# Altium PCB PCB1.PcbDoc
Units mil, origin at the board's own origin, x right, y up, seen from the top; angles counter-clockwise.
Board outline 6000 x 4000 mil, 2 copper layers (Top Layer, Bottom Layer); 13 components, 9 nets, 34 pads, 0 vias.
Unrouted connection lines stored in the file: 6.
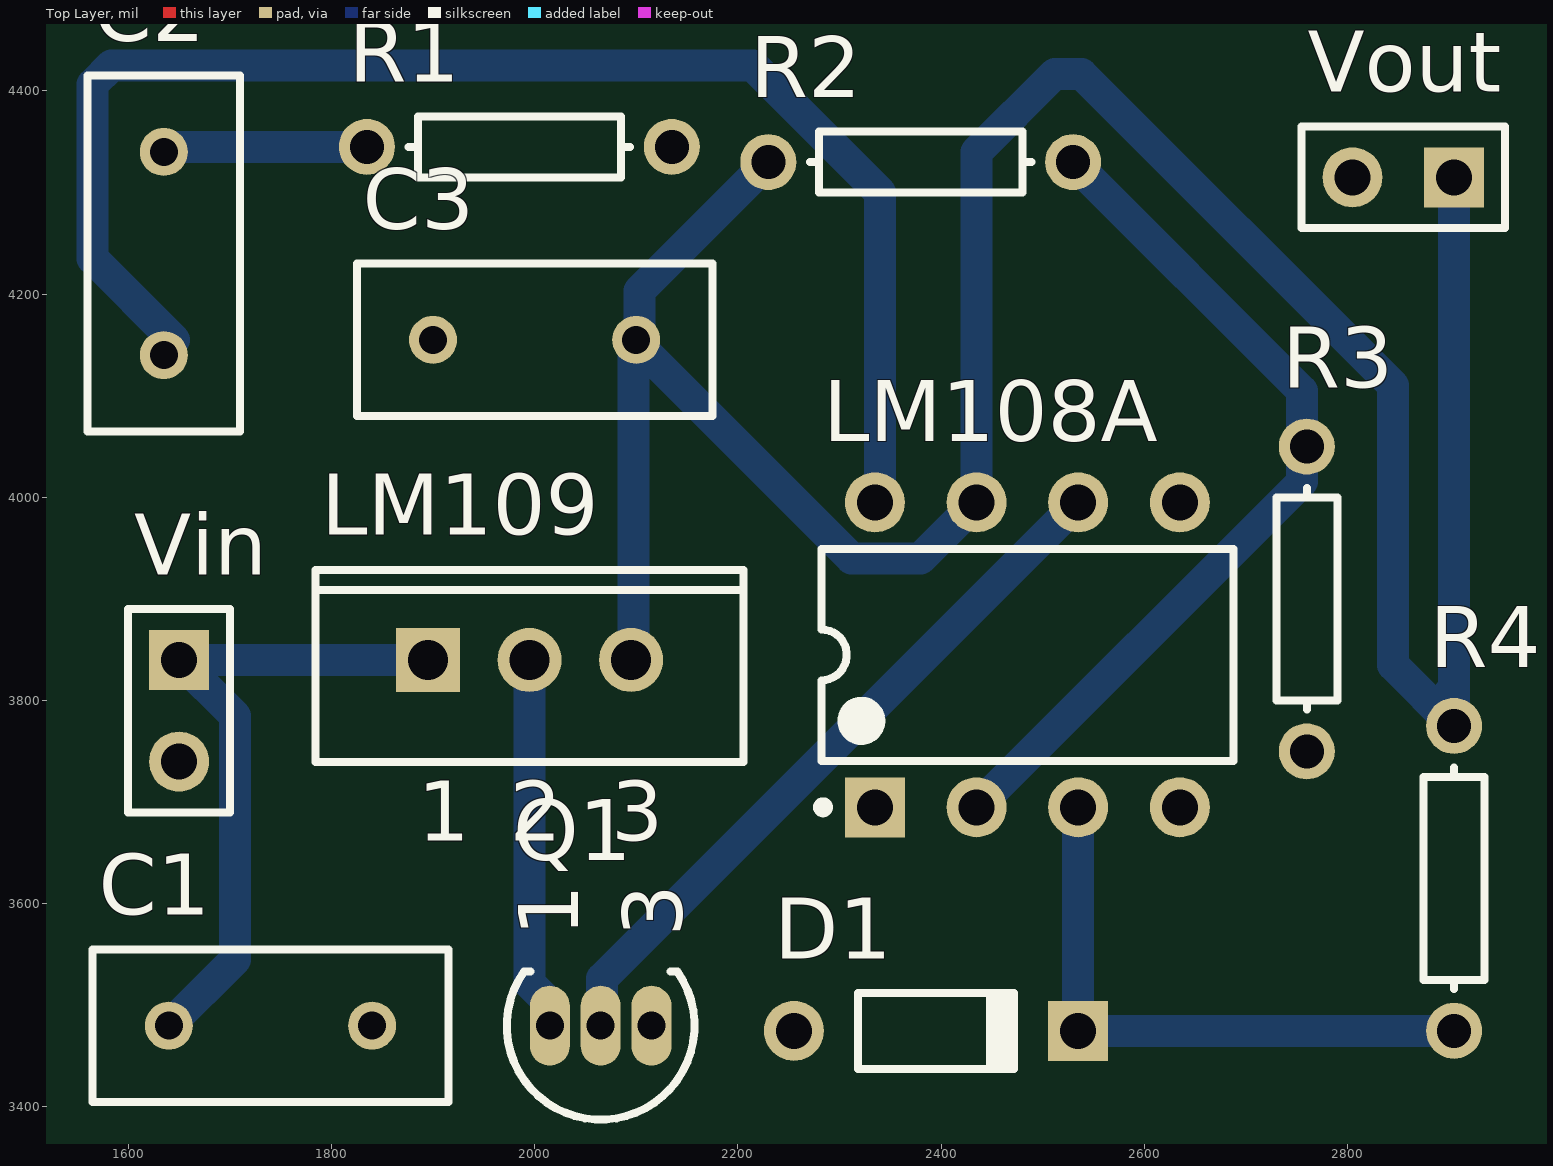
[diagram p0: Top Layer view]
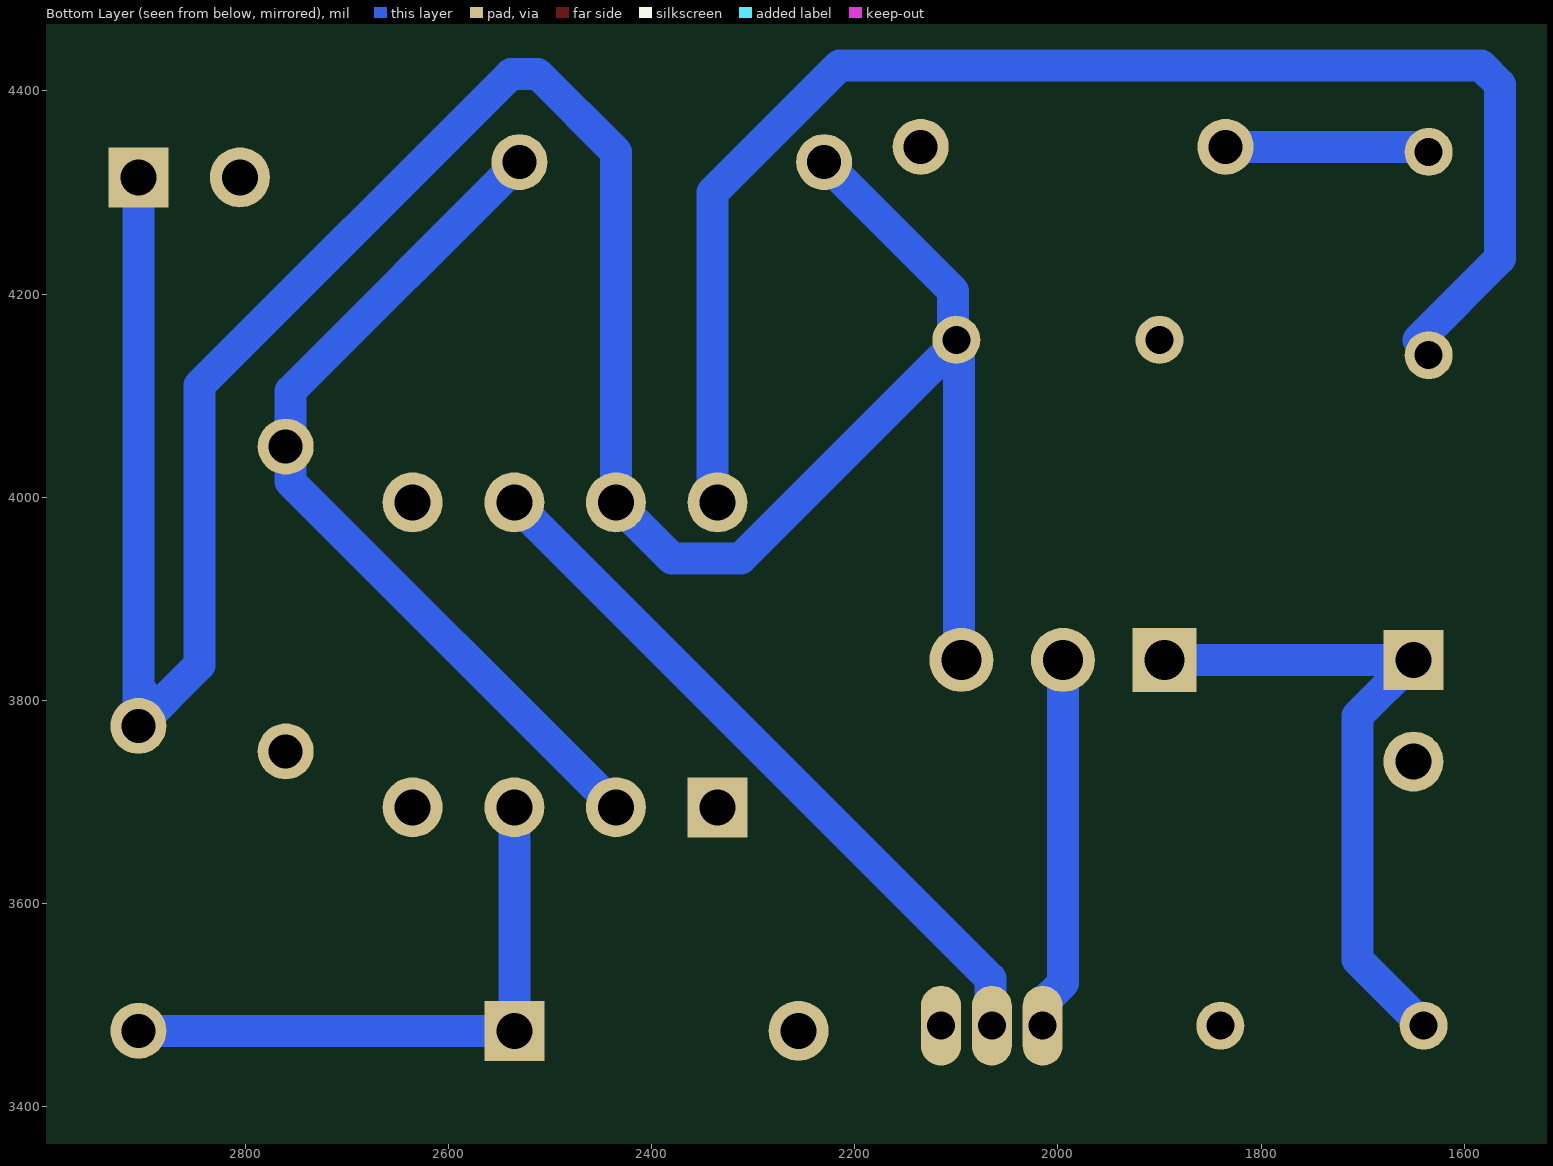
[diagram p1: Bottom Layer view, seen from below]

## Layer stack, top to bottom
Top Solder: solder mask 0.4, Solder Resist, Dk 3.5
Top Layer: signal copper 1.4
Dielectric 1: dielectric 12.6, FR-4, Dk 4.8
Bottom Layer: signal copper 1.4
Bottom Solder: solder mask 0.4, Solder Resist, Dk 3.5

## Board outline
1000,1000 7000,1000 7000,5000 1000,5000

## Design rules (kind name [scope] priority, off if disabled: settings)
Clearance [All] p1: gap=10 ignorepadtopadclearanceinfootprint=FALSE
PolygonConnect [All] p1: connectstyle=Relief reliefconductorwidth=10 reliefentries=4 polygonreliefangle="90 Angle" airgapwidth=10
RoutingLayers [All] p1: top layer_v5=FALSE bottom layer_v5=TRUE
RoutingVias [All] p1: holewidth=28 width=50 viastyle="Through Hole" minholewidth=28 minwidth=50 maxholewidth=28 maxwidth=50
SolderMaskExpansion [All] p1: expansion=0 istentingtop=FALSE
SupplyNets "Schematic Supply Nets" [InNet('GND')] p1: voltage=0.000
Width [All] p1: maxlimit=47.24 minlimit=10 preferedwidth=31.5 toplayer_maxwidth=10 toplayer_prefwidth=10 bottomlayer_minwidth=23.62 minimp=50.000000 maximp=50.000000 favimp=50.000000
29 further rules are at their usual default settings.

## Components (designator, comment, footprint, x,y, rotation, side; value= is the part's Value field where it differs from the comment)
C1 "Cap Pol1" RAD-0.2 1740,3480 r0 top value=2.2µF
C2 "Cap" RAD-0.2 1635,4240 r270 top value=100pF
C3 "Cap Pol1" RAD-0.2 2000,4155 r180 top value=100µF
D1 "1N829" DO-35 2395,3475 r0 top
LM108A "Op Amp" DIP-8 2485,3845 r90 top
LM109 "Volt Reg" TO-220-AB 1995,3840 r0 top
Q1 "2N4343" TO-92 2065,3480 r90 top
R1 "" AXIAL-0.3 1985,4345 r180 top value=30K
R2 ".005%" AXIAL-0.3 2380,4330 r180 top value=6K
R3 ".005%" AXIAL-0.3 2760,3900 r90 top value=10K
R4 "0.5%" AXIAL-0.3 2905,3625 r90 top value=510
Vin "Header 2" HDR1X2 1650,3840 r270 top
Vout "Header 2" HDR1X2 2905,4315 r180 top

## Footprints (in the part's own frame and the unit in brackets; to place one, negate y for a bottom-side part, rotate by r counter-clockwise, add the part's x,y. Pads: shape width x height; smd on the part's side, far side on the other; paste and mask are expansions set on the pad)
AXIAL-0.3 [mm] "Axial Device, Thru-Hole; 2 Leads; 0.3 in Pin Spacing"
  round 1.4 hole 0.85: 1(-3.81,0) 2(3.81,0)
  silkscreen extent -2.77,-0.76 2.77,0.76
DIP-8 [mm] "DIP; 8 Leads; Row Spacing 7.62 mm; Pitch 2.54 mm"
  rect 1.5x1.5 hole 0.9: 1(-3.81,3.81)
  round 1.5 hole 0.9: 2(-3.81,1.27) 3(-3.81,-1.27) 4(-3.81,-3.81) 5(3.81,-3.81) 6(3.81,-1.27) 7(3.81,1.27) 8(3.81,3.81)
  silkscreen extent -3.93,-5.15 2.65,5.23, body extent -3.6,-5.15 3.6,5.15, height 5.08
DO-35 [mm] "Diode, Axial; Body 3.8 x 1.9 mm (LxDia. max), Lead Dia. 0.53 mm (max)"
  round 1.5 hole 0.9: 1(-3.55,0)
  rect 1.5x1.5 hole 0.9: 2(3.55,0)
  silkscreen extent -1.95,-0.95 2.05,0.95
HDR1X2 [mm] "Connector; Header; 2 Position"
  rect 1.5x1.5 hole 0.9: 1(0,0)
  round 1.5 hole 0.9: 2(2.54,0)
  silkscreen extent -1.27,-1.27 3.81,1.27
RAD-0.2 [mm] "Radial Cap, Thru-Hole; 2 Leads; 0.2 in Pin Spacing"
  round 1.2 hole 0.7: 1(-2.54,0) 2(2.54,0)
  silkscreen extent -4.44,-1.91 4.44,1.91
TO-92 [mm] "TO, Flat Index; 3 In-Line, Axial Leads; Body Dia. 4.6mm; Leads 0.41 x 0.39 mm (max)"
  oval 2x1 hole 0.7: 1(0,1.27) 2(0,0) 3(0,-1.27)
  silkscreen extent -2.34,-2.34 1.35,2.34
TO-220-AB [mm] "TO, Thru-Hole, Vertical, Heatsink Mounted; 3 In-Line Leads; Pitch 2.54 mm"
  rect 1.6x1.6 hole 1: 1(-2.54,0)
  round 1.6 hole 1: 2(0,0) 3(2.54,0)
  silkscreen extent -5.35,-2.55 5.35,2.25

## Part data
C1 C3: "Polarized Capacitor (Radial)", LatestRevisionDate=17-Jul-2002, LatestRevisionNote="Re-released for DXP Platform.", PackageDescription="Polarized Capacitor (Radial); 2 Leads", PackageReference=RB7.6-15, Published=8-Jun-2000, Publisher="Altium Limited"
C2: "Capacitor", LatestRevisionDate=17-Jul-2002, LatestRevisionNote="Re-released for DXP Platform.", PackageDescription="Radial Cap, Thru-Hole; 2 Leads; 0.3 in Pin Spacing", PackageReference=RAD-0.3, Published=8-Jun-2000, Publisher="Altium Limited"
D1: library part "D Zener", "Zener Diode", LatestRevisionDate=17-Jul-2002, LatestRevisionNote="Re-released for DXP Platform.", PackageDescription="Diode, Thru-Hole; 2 Leads; 0.7 in Pin Spacing", PackageReference=DIODE-0.7, Published=8-Jun-2000, Publisher="Altium Limited"
LM108A: "FET Operational Amplifier", ComponentLink1Description="Manufacturer Link", ComponentLink1URL=http://www.analog.com/, DatasheetVersion="REV. B", LatestRevisionDate=17-Jul-2002, LatestRevisionNote="Re-released for DXP Platform.", PackageDescription="Can; 8 Leads; Pin Circle Dia. 5.08 mm; Lead Dia. 0.53 mm (max)", PackageReference=H-08A, PackageVersion=1990, Published=8-Jun-2000, Publisher="Altium Limited"
LM109: "Voltage Regulator", LatestRevisionDate=29-May-2009, LatestRevisionNote="IPC-7351 Footprint Added.", PackageDescription="3-Pin Transistor Outline Package 2.54 mm Pitch, 15.1 mm Lead Span", PackageReference=D2PAK, Published=24-Mar-1999, Publisher="Altium Limited"
Q1: library part JFET-P, "P-Channel JFET", LatestRevisionDate=17-Jul-2002, LatestRevisionNote="Re-released for DXP Platform.", PackageDescription="SC-89; 3 Flat Leads; Body 1.6 x 1.6 x 0.7 mm, inc leads (LxWxH typ)", PackageReference=TO-18A, Published=8-Jun-2000, Publisher="Altium Limited"
R1 R2 R3 R4: library part Res1, "Resistor", LatestRevisionDate=17-Jul-2002, LatestRevisionNote="Re-released for DXP Platform.", PackageDescription="Axial Device, Thru-Hole; 2 Leads; 0.3 in Pin Spacing", PackageReference=AXIAL-0.3, Published=8-Jun-2000, Publisher="Altium Limited"
Vin Vout: "Header, 2-Pin", LatestRevisionDate=17-Jul-2002, LatestRevisionNote="Re-released for DXP Platform.", Publisher="Altium Limited"

## Nets (pads, with @x,y where several pads share a name; then routed paths per layer and width w, separated by ;. In a path a pad name is that pad's centre, name@x,y a point inside that pad or via, vN(x,y) a via of type N, cw(c..) or ccw(c..) an arc to the next point about the centre after c; other vN are vias at no path point)
GND: C1.2 C3.2 D1.1 LM108A.4 Q1.3 R1.1 R3.1 Vin.2 Vout.2
NetC1_1: C1.1 LM109.1 Vin.1 | length 654.9
  Bottom Layer w31.5: C1.1 1705.28,3545.28 1705.28,3784.72 Vin.1 LM109.1
NetC2_1: C2.1 R1.2 | length 200
  Bottom Layer w31.5: C2.1@1635,4345 R1.2
NetC2_2: C2.2 LM108A.8 | length 1426.2
  Bottom Layer w31.5: C2.2@1645,4155 1565,4235 1565,4406.55 1583.45,4425 2215,4425 2340,4300 2340,4000 LM108A.8
NetC3_1: C3.1 LM108A.7 LM109.3 R2.2 R4.2 Vout.1 | length 2843.3
  Bottom Layer w31.5: LM109.3 2097.5,3842.5 2097.5,4152.5 C3.1 ; R2.2 2103.01,4203.01 2103.01,4158.01 C3.1 ; 2900.48,3807.69 2900.48,3779.52 R4.2 ; Vout.1 R4.2 ; C3.1 2100,4151.83 2312.1,3939.72 2379.72,3939.72 LM108A.7 2435,4340 2511.95,4416.95 2538.05,4416.95 2845,4110 2845,3835 R4.2
NetD1_2: D1.2 LM108A.3 R4.1 | length 590.3
  Bottom Layer w31.5: LM108A.3 2534.88,3694.88 2534.88,3475.12 D1.2 R4.1
NetLM108A_2: LM108A.2 R2.1 R3.2 | length 864.9
  Bottom Layer w31.5: LM108A.2 2755.48,4015.48 2755.48,4045.48 R3.2 2755.48,4054.52 2755.48,4104.52 R2.1
NetLM108A_6: LM108A.6 Q1.2 | length 709.7
  Bottom Layer w31.5: Q1.2 2066.51,3481.51 2066.51,3526.51 LM108A.6
NetLM109_2: LM109.2 Q1.1 | length 368.3
  Bottom Layer w31.5: LM109.2 1995,3521.82 2015,3501.82 Q1.1
pads on no net: LM108A.1 LM108A.5

## Text inside footprints (layer, text, board x,y; h text height)
LM109: Top Overlay "1" at 1885.16,3661.85 h59.06; Top Overlay "2" at 1975.32,3661.85 h59.06; Top Overlay "3" at 2075.32,3661.85 h59.06
Q1: Top Overlay "3" at 2145.12,3567.56 h59.05 r90; Top Overlay "1" at 2042.95,3567.56 h59.05 r90